# Altium PCB STEMxS_V1.00.01.PcbDoc
Units mm, origin at the board's own origin, x right, y up, seen from the top; angles counter-clockwise.
Board outline 52 x 30 mm, 2 copper layers (Top Layer, Bottom Layer); 25 components, 23 nets, 65 pads, 149 vias.
Unrouted connection lines stored in the file: 2.
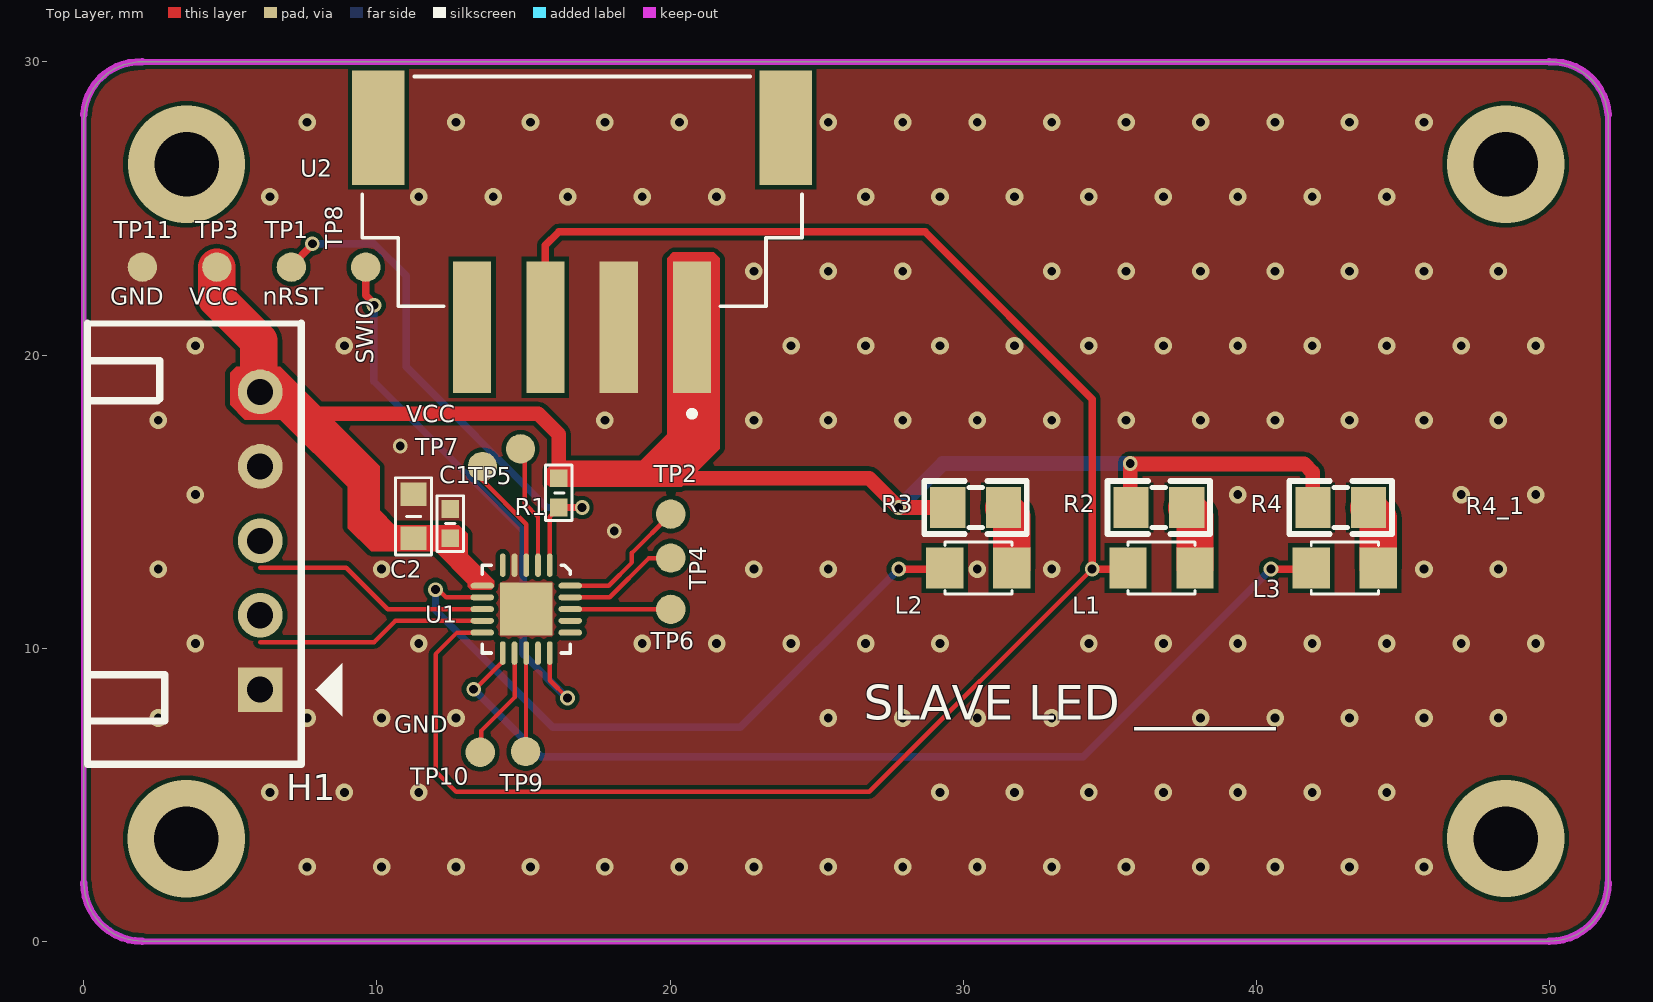
[diagram p0: Top Layer view]
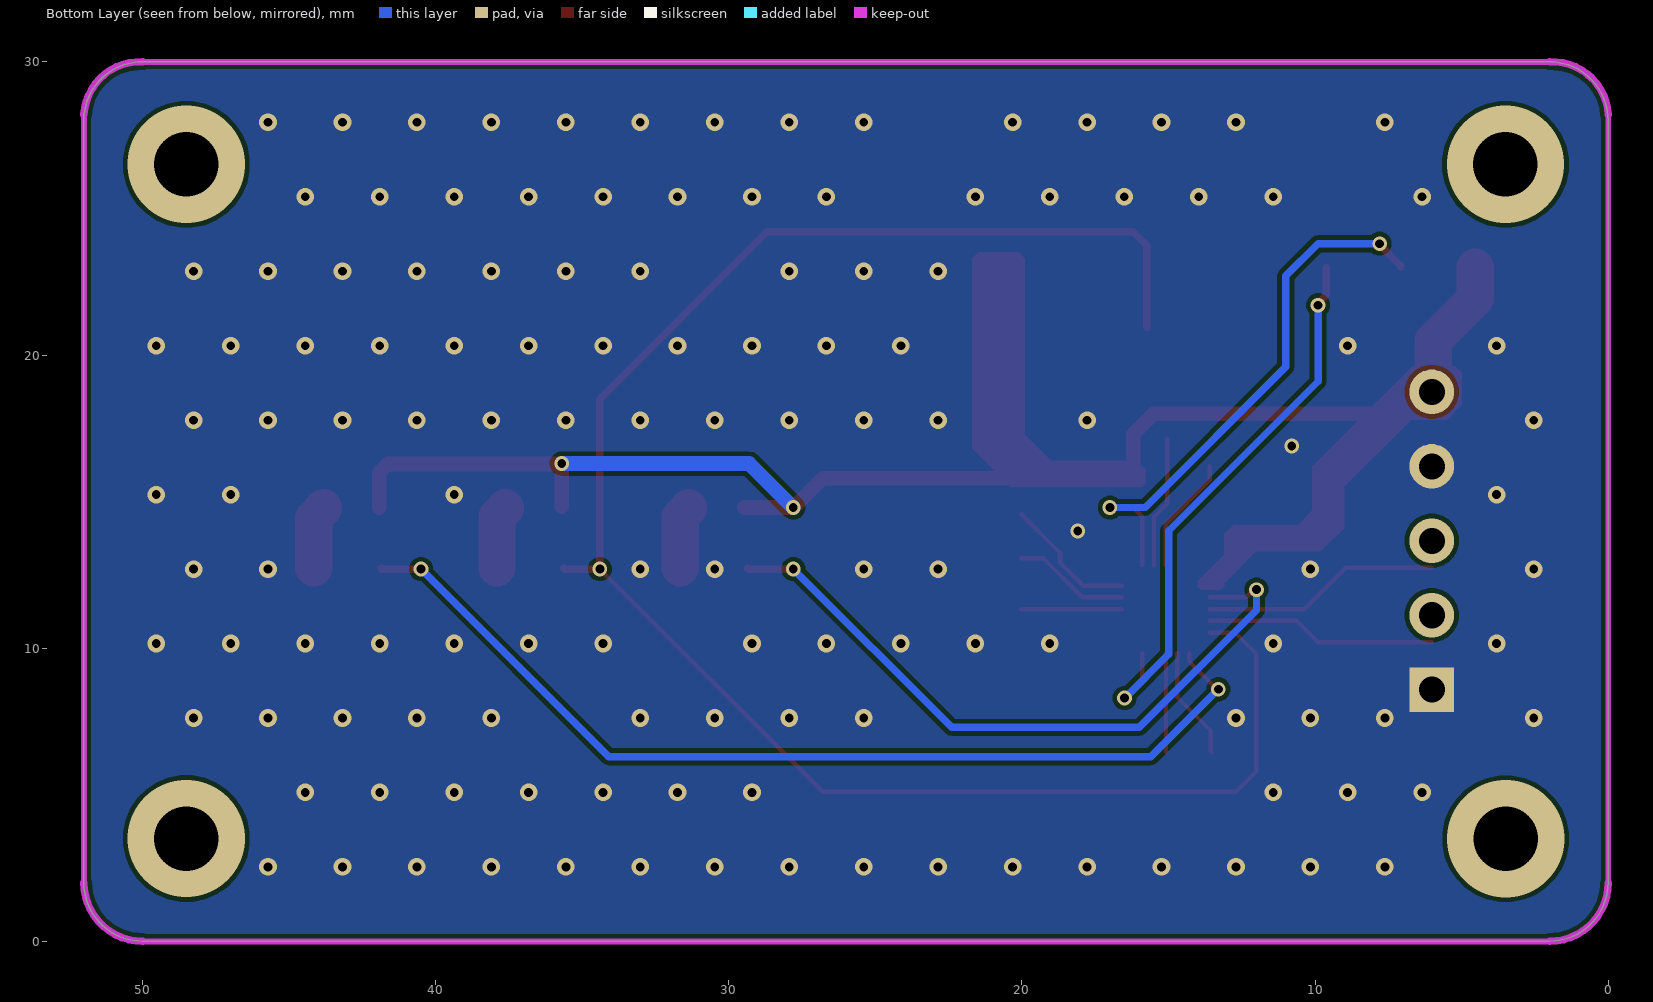
[diagram p1: Bottom Layer view, seen from below]
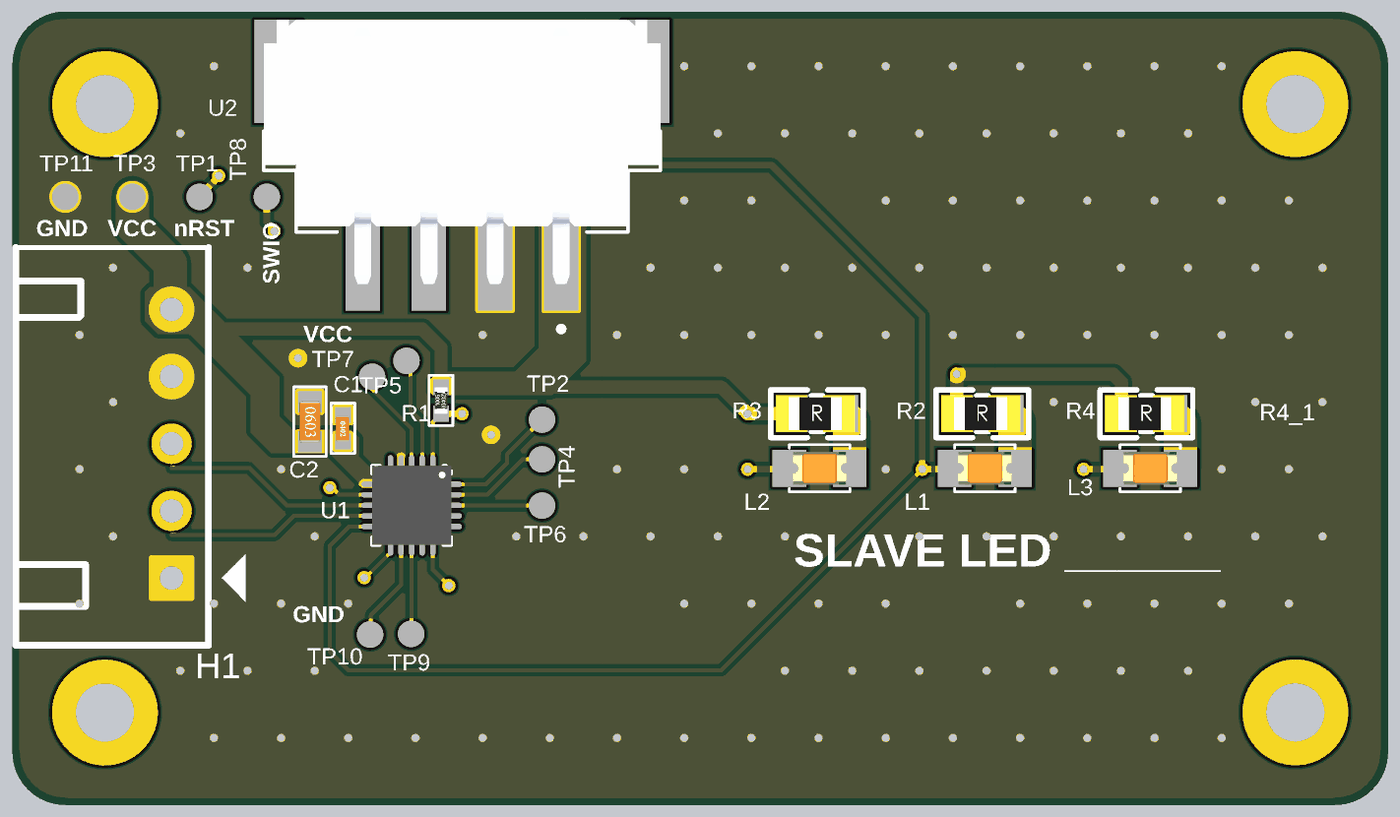
[diagram p2: 3D render of the assembled board from above, using the file's embedded part models]

## Layer stack, top to bottom
Top Solder: solder mask 0.0102, Solder Resist, Dk 3.5
Top Layer: signal copper 0.0356
Dielectric 1: dielectric 0.32, FR-4, Dk 4.8
Bottom Layer: signal copper 0.0356
Bottom Solder: solder mask 0.0102, Solder Resist, Dk 3.5

## Board outline
0.006,2.006 0.006,28.006 cw(c2.006,28.006) 2.006,30.006 50.006,30.006 cw(c50.006,28.006) 52.006,28.006 52.006,2.006 cw(c50.006,2.006) 50.006,0.006 2.006,0.006 cw(c2.006,2.006)

## Design rules (kind name [scope] priority, off if disabled: settings)
Clearance [All] p1: gap=0.152 ignorepadtopadclearanceinfootprint=FALSE
PolygonConnect [All] p1: connectstyle=Direct reliefconductorwidth=0.254 reliefentries=4 polygonreliefangle="90 Angle" airgapwidth=0.254
RoutingVias [All] p1: holewidth=0.3 width=0.5 viastyle="Through Hole" minholewidth=0.3 minwidth=0.5 maxholewidth=5 maxwidth=10
SolderMaskExpansion [All] p1: expansion=0.102 istentingtop=FALSE
SupplyNets "Schematic Supply Nets_1" [InNet('VCC')] p1: voltage=0.000
SupplyNets "Schematic Supply Nets" [InNet('GND')] p2: voltage=0.000
Width [All] p1: maxlimit=1.27 minlimit=0.152 preferedwidth=0.254
30 further rules are at their usual default settings.

## Classes and differential pairs
component class SLAVE_BOARD: C1 C2 H1 L1 L2 L3 R1 R2 R3 R4 TP1 TP2 TP3 TP4 TP5 TP6 TP7 TP8 TP9 TP10 TP11 U1 U2

## Components (designator, comment, footprint, x,y, rotation, side; value= is the part's Value field where it differs from the comment)
C1 "0.1u_0402_16V" C0402 12.483,14.23 r90 top
C2 "1u_0603_50V" C0603 11.25,14.5 r90 top
H1 "Header 5P 2.54 Duc Cong" "Header 5P DC 2.54" 6.02,8.584 r180 top
L1 "LED 0805" LED-0805-Orange 37.911,12.735 r180 top
L2 "LED 0805" LED-0805-Orange 31.661,12.735 r180 top
L3 "LED 0805" LED-0805-Orange 44.161,12.735 r180 top
L3 "LED 0805" LED-0805-Orange 44.161,12.735 r180 top
R1 "10K_0402_1%" R0402 16.225,15.3 r90 top
R2 "470_0805" "tro smd 0805" 36.671,14.861 r0 top
R3 "470_0805" "tro smd 0805" 30.421,14.861 r0 top
R4 "470_0805" "tro smd 0805" 42.875,14.861 r0 top
R4_1 "470_0805" "tro smd 0805" 42.875,14.861 r0 top (schematic designator R4)
TP1 "TP" TP_1MM 7.08,23 r90 top
TP2 "TP" TP_1MM 20.025,14.575 r90 top
TP3 "TP" TP_1MM 4.54,23 r90 top
TP4 "TP" TP_1MM 20.025,13.075 r90 top
TP5 "TP" TP_1MM 14.9,16.8 r90 top
TP6 "TP" TP_1MM 20.025,11.325 r90 top
TP7 "TP" TP_1MM 13.6,16.2 r90 top
TP8 "TP" TP_1MM 9.62,23 r90 top
TP9 "TP" TP_1MM 15.075,6.475 r90 top
TP10 "TP" TP_1MM 13.525,6.45 r90 top
TP11 "TP" TP_1MM 2,23 r90 top
U1 "CH32V003F4U6" QFN20_3X3 15.096,11.334 r270 top
U2 "XH2.5-4P" XH2.5-4P 17,25.25 r180 top

## Footprints (in the part's own frame and the unit in brackets; to place one, negate y for a bottom-side part, rotate by r counter-clockwise, add the part's x,y. Pads: shape width x height; smd on the part's side, far side on the other; paste and mask are expansions set on the pad)
C0402 [mm]
  rect 0.6x0.6 smd: 1(0.52,-0.017) 2(-0.48,-0.017)
  silkscreen extent -0.93,-0.47 0.97,0.43, body extent -0.5,-0.25 0.5,0.25, height 0.51
C0603 [mm]
  rect 0.8x0.9 smd: 1(0.75,0) 2(-0.75,0)
  silkscreen extent -1.31,-0.61 1.31,0.61, body extent -0.81,-0.4 0.79,0.4, height 0.81
"Header 5P DC 2.54" [mil]
  rect 60x60 hole 35: 1(0,0)
  round 60 hole 35: 2(0,-100) 3(0,-200) 4(0,-300) 5(0,-400)
  silkscreen extent -110,-492 232,100
LED-0805-Orange [mil]
  rect 50x55 smd: 1(0,0) 2(90,0)
  silkscreen extent 0,-35 90,35, body extent 5,-25 85,25, height 43
QFN20_3X3 [mm]
  oval 0.8x0.2 smd: 1(-1.5,0.8) 2(-1.5,0.4) 3(-1.5,0) 4(-1.5,-0.4) 5(-1.5,-0.8) 11(1.5,-0.8) 12(1.5,-0.4) 13(1.5,0) 14(1.5,0.4) 15(1.5,0.8)
  oval 0.2x0.8 smd: 6(-0.8,-1.5) 7(-0.4,-1.5) 8(0,-1.5) 9(0.4,-1.5) 10(0.8,-1.5) 16(0.8,1.5) 17(0.4,1.5) 18(0,1.5) 19(-0.4,1.5) 20(-0.8,1.5)
  rect 1.8x1.8 smd paste-2: 21(0,0)
  silkscreen extent -1.5,-1.5 1.5,1.5, body extent -1.5,-1.5 1.5,1.5, height 0.6
R0402 [mm]
  rect 0.6x0.6 smd: 1(0.5,0.018) 2(-0.5,0.018)
  silkscreen extent -0.95,-0.43 0.95,0.47, body extent -0.5,-0.23 0.5,0.27, height 0.35
TP_1MM [mm]
  round 1 smd: 1(0,0)
"tro smd 0805" [mm]
  rect 1.2x1.4 smd: 1(-0.946,-0.061) 2(0.954,-0.061)
  silkscreen extent -1.75,-0.97 1.75,0.84, body extent -1.56,-0.76 1.44,0.64, height 0.53
XH2.5-4P [mm]
  rect 1.3x4.5 smd: 1(-3.75,4.3) 2(-1.25,4.3) 3(1.25,4.3) 4(3.75,4.3)
  rect 1.8x3.9 smd: SH1(-6.95,-2.5) SH2(6.95,-2.5)
  silkscreen extent -7.5,-4.25 7.5,7.35, body extent -7.5,-4.45 7.5,5.55, height 6.12

## Part data
C1: library part C_0402_0.1u_16V
C2: library part C_0603_1u_50V
H1: "Cắm", Chung_Loai=Cắm, Don_Vi=Con, Ma_Hang=MH001308, Ten_Linh_Kien="Header 5P XH2.54-5P Đực Cong"
L1 L2 L3 L3: library part "LED 0805 Cam", "Dán", Chung_Loai=Dán, Don_Vi=Con, Ma_Hang=MH002328, Ten_Linh_Kien="LED 0805 Màu Cam ( Orange)"
R1: library part R_0402_10K_1%
R2 R3 R4 R4_1: library part "Tro 0805 1% 10k", "Dán", Chung_Loai=Dán, Don_Vi=Con, Ma_Hang=MH005473, So_Chan=2, Ten_Linh_Kien="Trở 0805 1% 10k"
TP1 TP2 TP3 TP4 TP5 TP6 TP7 TP8 TP9 TP10 TP11: "TEST POINT"
U2: "https://www.lcsc.com/product-detail/C161861.html"

## Via types
v1: diameter 0.6/0.6 (per signal layer), hole 0.3, Top Layer to Bottom Layer, tented both sides, 129 vias
v2: diameter 0.5, hole 0.3, Top Layer to Bottom Layer, 14 vias
v3: diameter 4, hole 2.2, Top Layer to Bottom Layer, 6 vias

## Nets (pads, with @x,y where several pads share a name; then routed paths per layer and width w, separated by ;. In a path a pad name is that pad's centre, name@x,y a point inside that pad or via, vN(x,y) a via of type N, cw(c..) or ccw(c..) an arc to the next point about the centre after c; other vN are vias at no path point)
BUT1: U1.5
BUT2: U1.14
D_DS18B20: U1.16
DHT11_O: U1.17
GND: C1.1 C2.1 H1.1 H1.4 TP11.1 U1.4 U1.21 U2.2
  other v1: 7.62,2.54 10.16,2.54 12.7,2.54 15.24,2.54 17.78,2.54 20.32,2.54 22.86,2.54 25.4,2.54 27.94,2.54 30.48,2.54 33.02,2.54 35.56,2.54 38.1,2.54 40.64,2.54 43.18,2.54 45.72,2.54 6.35,5.08 8.89,5.08 11.43,5.08 29.21,5.08 31.75,5.08 34.29,5.08 36.83,5.08 39.37,5.08 41.91,5.08 44.45,5.08 2.54,7.62 7.62,7.62 10.16,7.62 12.7,7.62 25.4,7.62 27.94,7.62 30.48,7.62 33.02,7.62 38.1,7.62 40.64,7.62 43.18,7.62 45.72,7.62 48.26,7.62 3.81,10.16 11.43,10.16 19.05,10.16 21.59,10.16 24.13,10.16 26.67,10.16 29.21,10.16 34.29,10.16 36.83,10.16 39.37,10.16 41.91,10.16 44.45,10.16 46.99,10.16 49.53,10.16 2.54,12.7 10.16,12.7 22.86,12.7 25.4,12.7 30.48,12.7 33.02,12.7 45.72,12.7 48.26,12.7 3.81,15.24 39.37,15.24 46.99,15.24 49.53,15.24 2.54,17.78 17.78,17.78 22.86,17.78 25.4,17.78 27.94,17.78 30.48,17.78 33.02,17.78 35.56,17.78 38.1,17.78 40.64,17.78 43.18,17.78 45.72,17.78 48.26,17.78 3.81,20.32 8.89,20.32 24.13,20.32 26.67,20.32 29.21,20.32 31.75,20.32 34.29,20.32 36.83,20.32 39.37,20.32 41.91,20.32 44.45,20.32 46.99,20.32 49.53,20.32 22.86,22.86 25.4,22.86 27.94,22.86 33.02,22.86 35.56,22.86 38.1,22.86 40.64,22.86 43.18,22.86 45.72,22.86 48.26,22.86 6.35,25.4 11.43,25.4 13.97,25.4 16.51,25.4 19.05,25.4 21.59,25.4 26.67,25.4 29.21,25.4 31.75,25.4 34.29,25.4 36.83,25.4 39.37,25.4 41.91,25.4 44.45,25.4 7.62,27.94 12.7,27.94 15.24,27.94 17.78,27.94 20.32,27.94 25.4,27.94 27.94,27.94 30.48,27.94 33.02,27.94 35.56,27.94 38.1,27.94 40.64,27.94 43.18,27.94 45.72,27.94
  other v2: 18.1,14 10.8,16.9
LED1: L1.2 U1.10 U2.3 | length 62.8
  Top Layer w0.152: U1.10 12.734,10.534 12,9.8 12,5.8 12.7,5.1 26.8,5.1 v2(34.4,12.7)
  Top Layer w0.254: U2.3 15.75,23.75 16.2,24.2 28.7,24.2 34.4,18.5 v2(34.4,12.7) 35.59,12.7 L1.2
LED2: L2.2 U1.7 | length 23.7
  Top Layer w0.152: v2(12,12) 12.094,12 12.36,11.734 U1.7
  Top Layer w0.254: v2(27.8,12.7) 29.34,12.7 L2.2
  Bottom Layer w0.254: v2(12,12) 12,11.3 16,7.3 22.4,7.3 v2(27.8,12.7)
LED3: L3.2 U1.11 | length 35.3
  Top Layer w0.152: v2(13.3,8.6) 13.349,8.6 14.296,9.547 U1.11
  Top Layer w0.254: L3.2@41.84,12.7 41.875,12.735 L3.2@41.84,12.7 ; L3.2@41.84,12.7 v2(40.5,12.7) L3.2@41.84,12.7
  Bottom Layer w0.254: v2(13.3,8.6) 15.6,6.3 34.1,6.3 v2(40.5,12.7)
  other v2: 40.5,12.7
NetL1_1: L1.1 R2.2 | length 2.2
  Top Layer w1.27: R2.2 37.625,14.77 37.911,14.484 L1.1
NetL2_1: L2.1 R3.2 | length 2.2
  Top Layer w1.27: R3.2 31.375,14.77 31.661,14.484 L2.1
NetL3_1: L3.1 R4.2 R4_1.2 | length 4.4
  Top Layer w1.27: R4_1.2@43.829,14.77 R4_1.2@44.161,14.438 ; R4_1.2@43.829,14.77 R4_1.2 R4_1.2@43.829,14.77 ; R4_1.2@43.829,14.77 R4_1.2@44.161,14.438 ; R4_1.2@44.161,14.438 44.161,12.735 R4_1.2@44.161,14.438
nRST: R1.2 TP1.1 U1.1 | length 18.7
  Top Layer w0.152: U1.1 15.896,14.488 R1.2
  Top Layer w0.254: TP1.1 7.08,23.04 7.8,23.76 v2(7.8,23.8) ; R1.2 v2(17,14.8)
  Bottom Layer w0.254: v2(7.8,23.8) 9.9,23.8 11,22.7 11,19.6 15.8,14.8 v2(17,14.8)
PA1: TP5.1 U1.2 | length 4.5
  Top Layer w0.152: TP5.1@15.05,17.15 15.05,14.925 15.496,14.479 U1.2
PA2: TP7.1 U1.3 | length 4
  Top Layer w0.152: TP7.1 13.6,15.725 15.096,14.229 U1.3
PD4: TP6.1 U1.18 | length 3.4
  Top Layer w0.152: U1.18 16.6,11.329 20.021,11.329 TP6.1
RX0: TP2.1 U1.20 | length 4.6
  Top Layer w0.152: U1.20 17.909,12.134 18.7,12.925 18.7,13.25 TP2.1
SCL: H1.2 U1.9 | length 7.9
  Top Layer w0.152: 6.02,10.21 9.91,10.21 10.634,10.934 U1.9
SDA: H1.3 U1.8 | length 8.2
  Top Layer w0.152: 6.02,12.75 8.95,12.75 10.366,11.334 U1.8
SW_SCK: TP10.1 U1.12 | length 3.9
  Top Layer w0.152: TP10.1 13.554,6.479 13.554,7.179 14.696,8.321 U1.12
SW_SDA: TP9.1 U1.13 | length 3.4
  Top Layer w0.152: TP9.1 15.087,6.487 15.087,9.825 U1.13
SWIO: TP8.1 U1.15 | length 19.3
  Top Layer w0.152: U1.15 15.896,8.904 v2(16.5,8.3)
  Top Layer w0.254: TP8.1 9.62,22.047 9.9,21.767 v2(9.9,21.7)
  Bottom Layer w0.254: v2(9.9,21.7) 9.9,19.1 15,14 15,9.8 v2(16.5,8.3)
TX0: TP4.1 U1.19 | length 4
  Top Layer w0.152: U1.19 17.94,11.734 19.281,13.075 TP4.1
VCC: C1.2 C2.2 H1.5 R1.1 R2.1 R3.1 R4.1 R4_1.1 TP3.1 U1.6 U2.1 | length 48.4
  Top Layer w0.5: H1.5 6.08,18.744 6.825,18 15.5,18 16.207,17.293 R1.1 26.8,15.8 v2(27.8,14.8) R3.1 ; R2.1@35.7,14.825 v2(35.7,16.3) 35.714,16.286 41.637,16.286 41.929,15.993 R4_1.1
  Top Layer w1.27: TP3.1 4.54,21.919 5.971,20.487 H1.5@5.971,18.744
  Bottom Layer w0.5: v2(27.8,14.8) 29.3,16.3 v2(35.7,16.3)
pads on no net: U2.4 U2.SH1 U2.SH2
copper on no net:
  other v3: 3.5,3.5 48.506,3.506 48.506,3.506 3.506,26.506 48.506,26.506 48.506,26.506

## Polygon pours and split planes (outlines as drawn)
GND on Bottom Layer "NONET_L-01_P-001" (solid, remove dead copper, pour order 0): 0,0 58.4,0 61.3,2.9 61.3,28.2 54.9,34.6 0,34.6 0,32.9
GND on Top Layer "NONET_L-01_P-001" (solid, remove dead copper, pour order 1): 0,0 58.4,0 61.3,2.9 61.3,28.2 54.9,34.6 0,34.6 0,32.9

## Keep-outs
Keep-Out Layer:
  lines w0.2: 0,2 0,28.2 ; 2,0 50,0 ; 2,30 50,30 ; 52,2 52,28.2
  lines w0.254: 0,2 ccw(c2,2) 2,0 ; 0,28.2 cw(c1.9,28.1) 2,30 ; 50,0 ccw(c50,2) 52,2 ; 50,30 cw(c50.1,28.1) 52,28.2

## Other copper
Top Layer:
  region net VCC: 19.9,17.3 19,16.4 16.1,16.4 15.8,16.1 15.8,15.6 15.9,15.5 20.4,15.5 21.7,16.8 21.7,23.3 21.5,23.5 20.1,23.5 19.9,23.3 19.9,23.1
  region net VCC: 5,19.4 5,18.3 5.5,17.8 6.7,17.8 9,15.5 9,14.1 9.8,13.3 12,13.3 13.1,12.2 13.1,12.1 13.2,12 13.9,12 14,12.1 14,12.3 13.1,13.2 13.1,13.9 12.8,14.2 10.6,14.2 10.1,14.7 10.1,16.2 6.7,19.6 5.2,19.6

## Silkscreen, mask and mechanical layers (free items; w line width, h text height)
Top Overlay:
  text "GND" at 0.9,21.512 h1
  text "VCC" at 3.6,21.511 h1
  text "nRST" at 6.1,21.512 h1
  text "SWIO" at 10.088,19.7 h1 r90
  text "VCC" at 11,17.511 h1
  text "SLAVE LED ______" at 26.616,7.161 h2
  text "GND" at 10.6,6.912 h1
Mechanical 4:
  circle w0.013: c9.006,9.926 r0.5
  circle w0.013: c9.006,12.466 r0.5
  circle w0.013: c9.006,15.006 r0.5
  circle w0.013: c9.006,17.546 r0.5
  circle w0.013: c9.006,20.086 r0.5
  circle w0.013: c1.606,9.926 r0.5
  circle w0.013: c1.606,12.466 r0.5
  circle w0.013: c1.606,15.006 r0.5
  circle w0.013: c1.606,17.546 r0.5
  circle w0.013: c1.606,20.086 r0.5
  circle w0.013: c48.506,3.506 r1.6
  circle w0.013: c48.506,26.506 r1.6
  circle w0.013: c3.506,3.506 r1.6
  circle w0.013: c3.506,26.506 r1.6
  lines w0.013: 0.006,2.006 ccw(c2.006,2.006) 2.006,0.006 50.006,0.006 ccw(c50.006,2.006) 52.006,2.006 52.006,28.006 ccw(c50.006,28.006) 50.006,30.006 2.006,30.006 ccw(c2.006,28.006) 0.006,28.006 0.006,2.006 ; 0.006,7.506 11.506,7.506 11.506,22.506 0.006,22.506 0.006,7.506 ; 0.006,8.206 3.206,8.206 3.206,21.806 0.006,21.806 0.006,8.206 ; 14.506,13.506 17.506,13.506 17.506,16.506 14.506,16.506 14.506,13.506 ; 20.006,1.506 44.506,1.506 44.506,28.506 20.006,28.506 20.006,1.506